# Altium PCB Solenoid-Board-v2.0.PcbDoc (part 1 of 3)
Units mil, origin at the board's own origin, x right, y up, seen from the top; angles counter-clockwise.
Board outline 3149.61 x 4330.71 mil, 2 copper layers (Top Layer, Bottom Layer), stack 61.811 mil thick; 169 components, 111 nets, 466 pads, 161 vias.
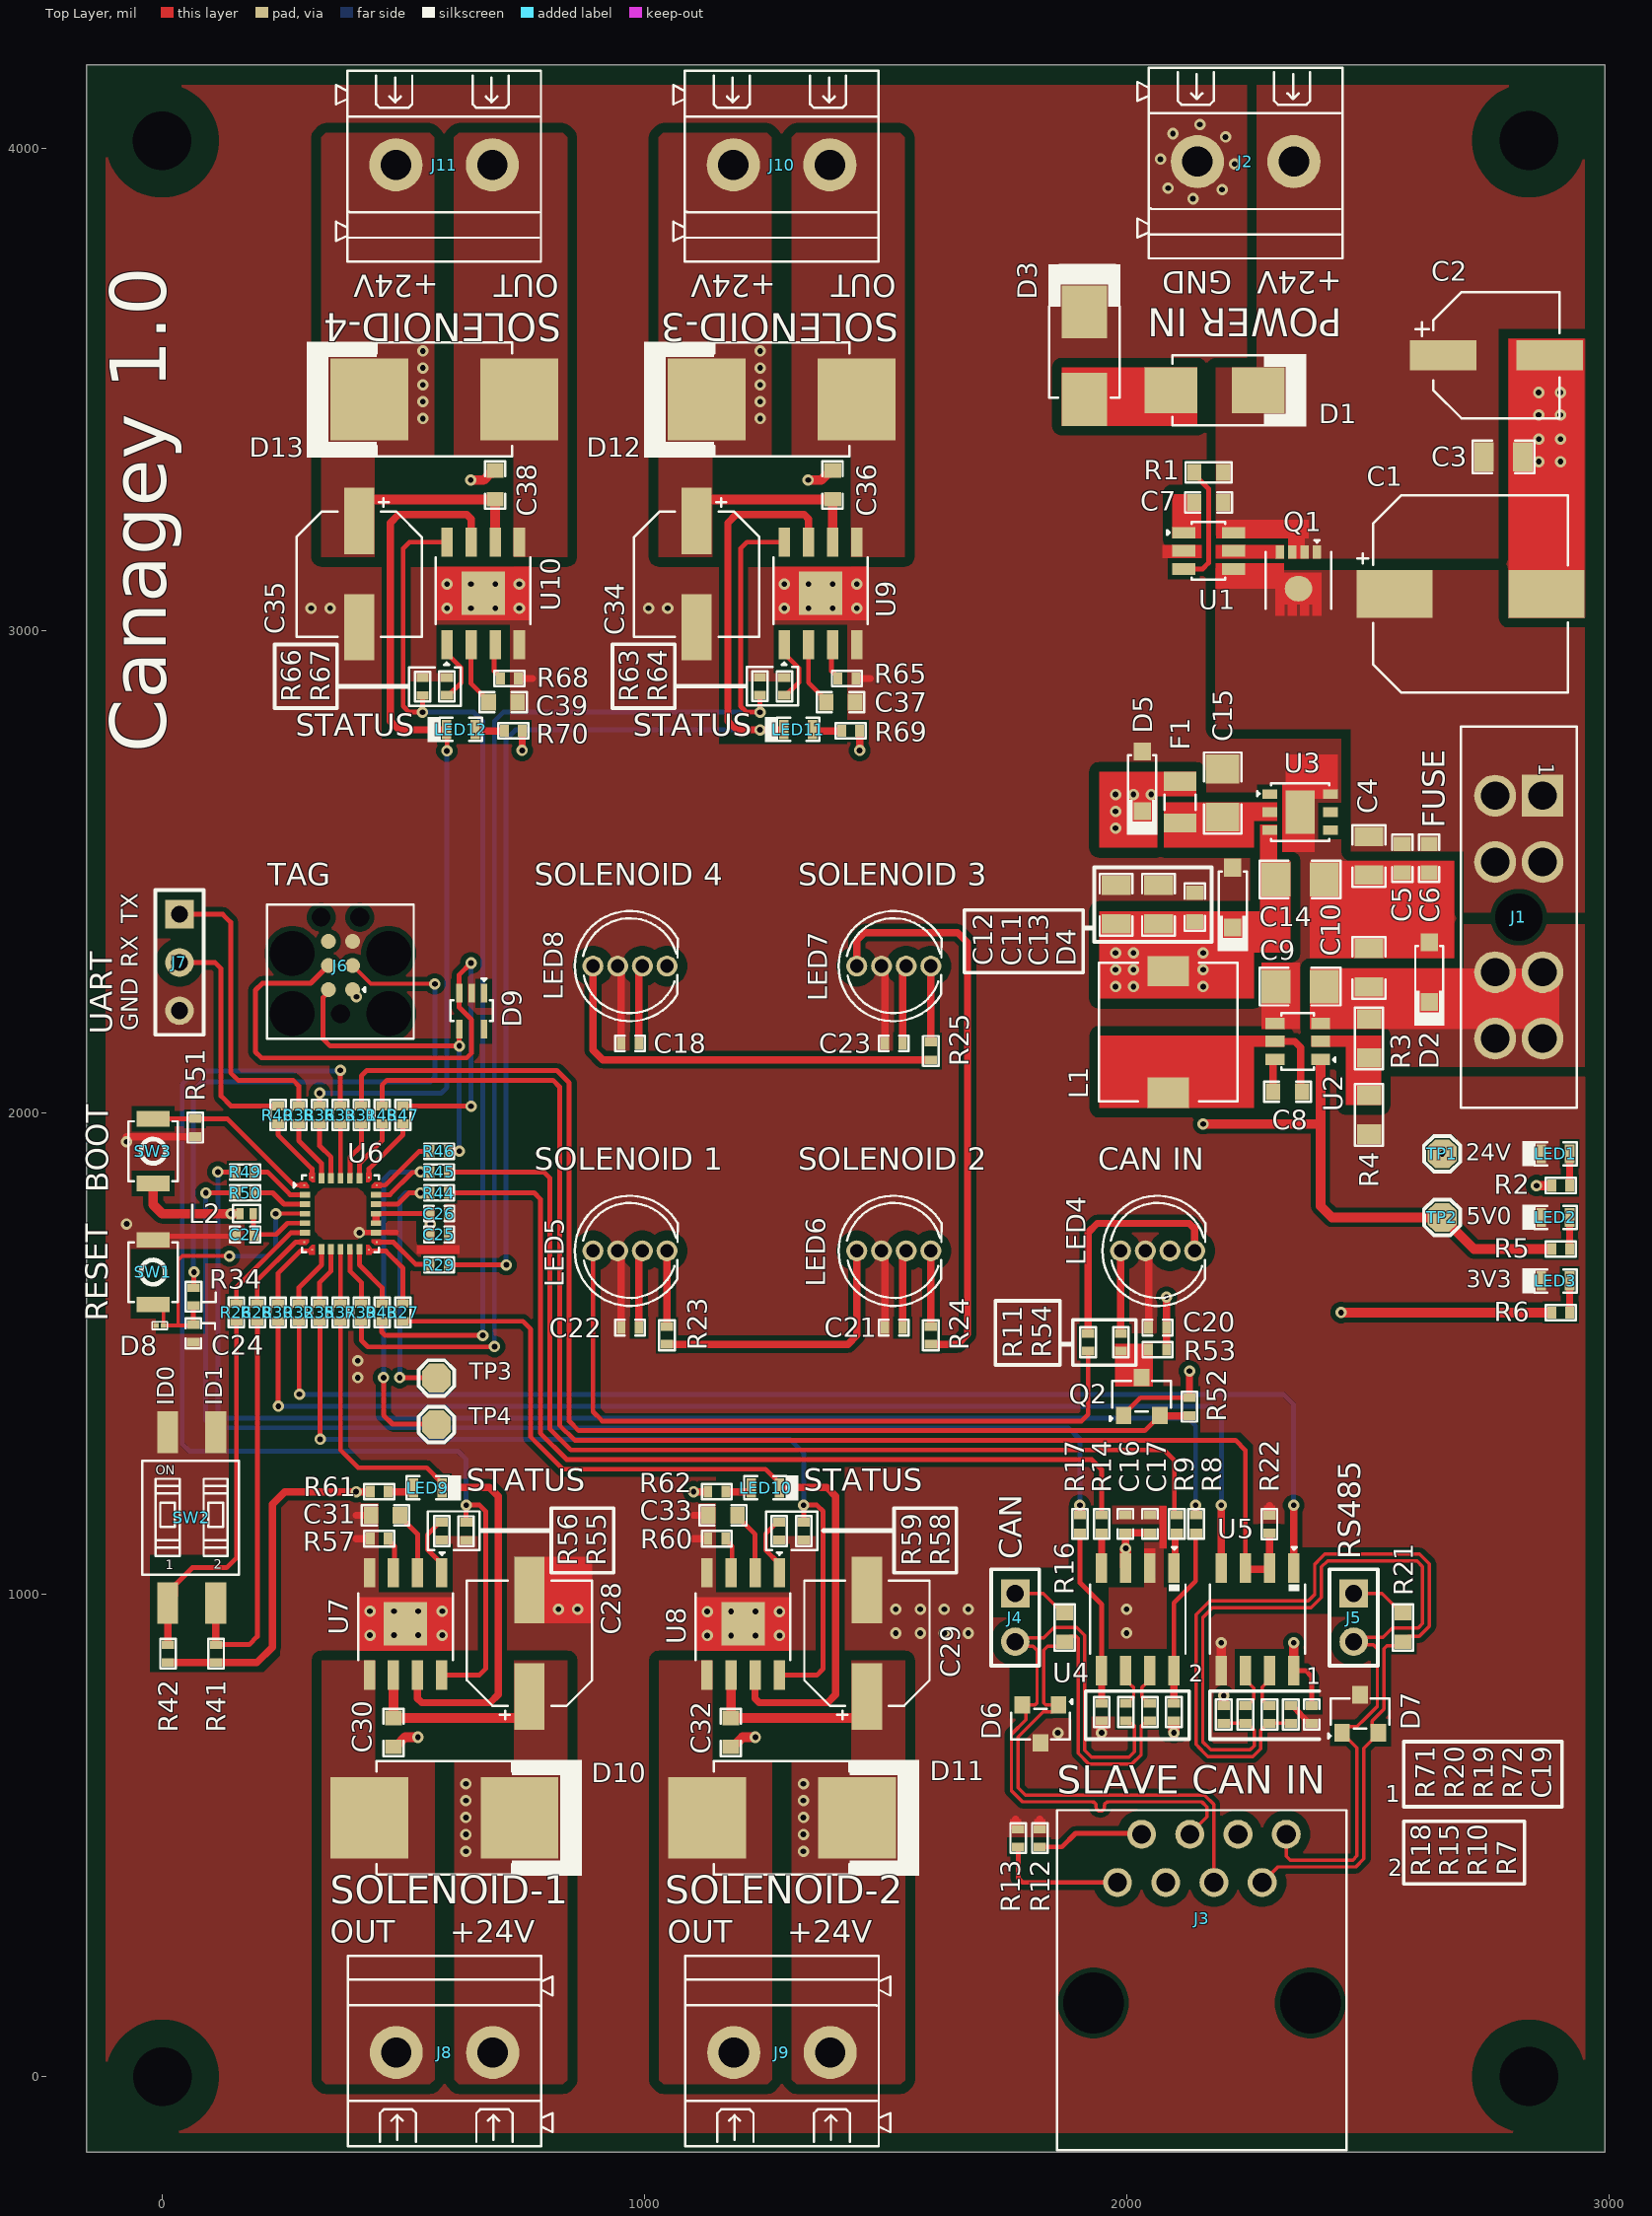
[diagram p0: Top Layer view]
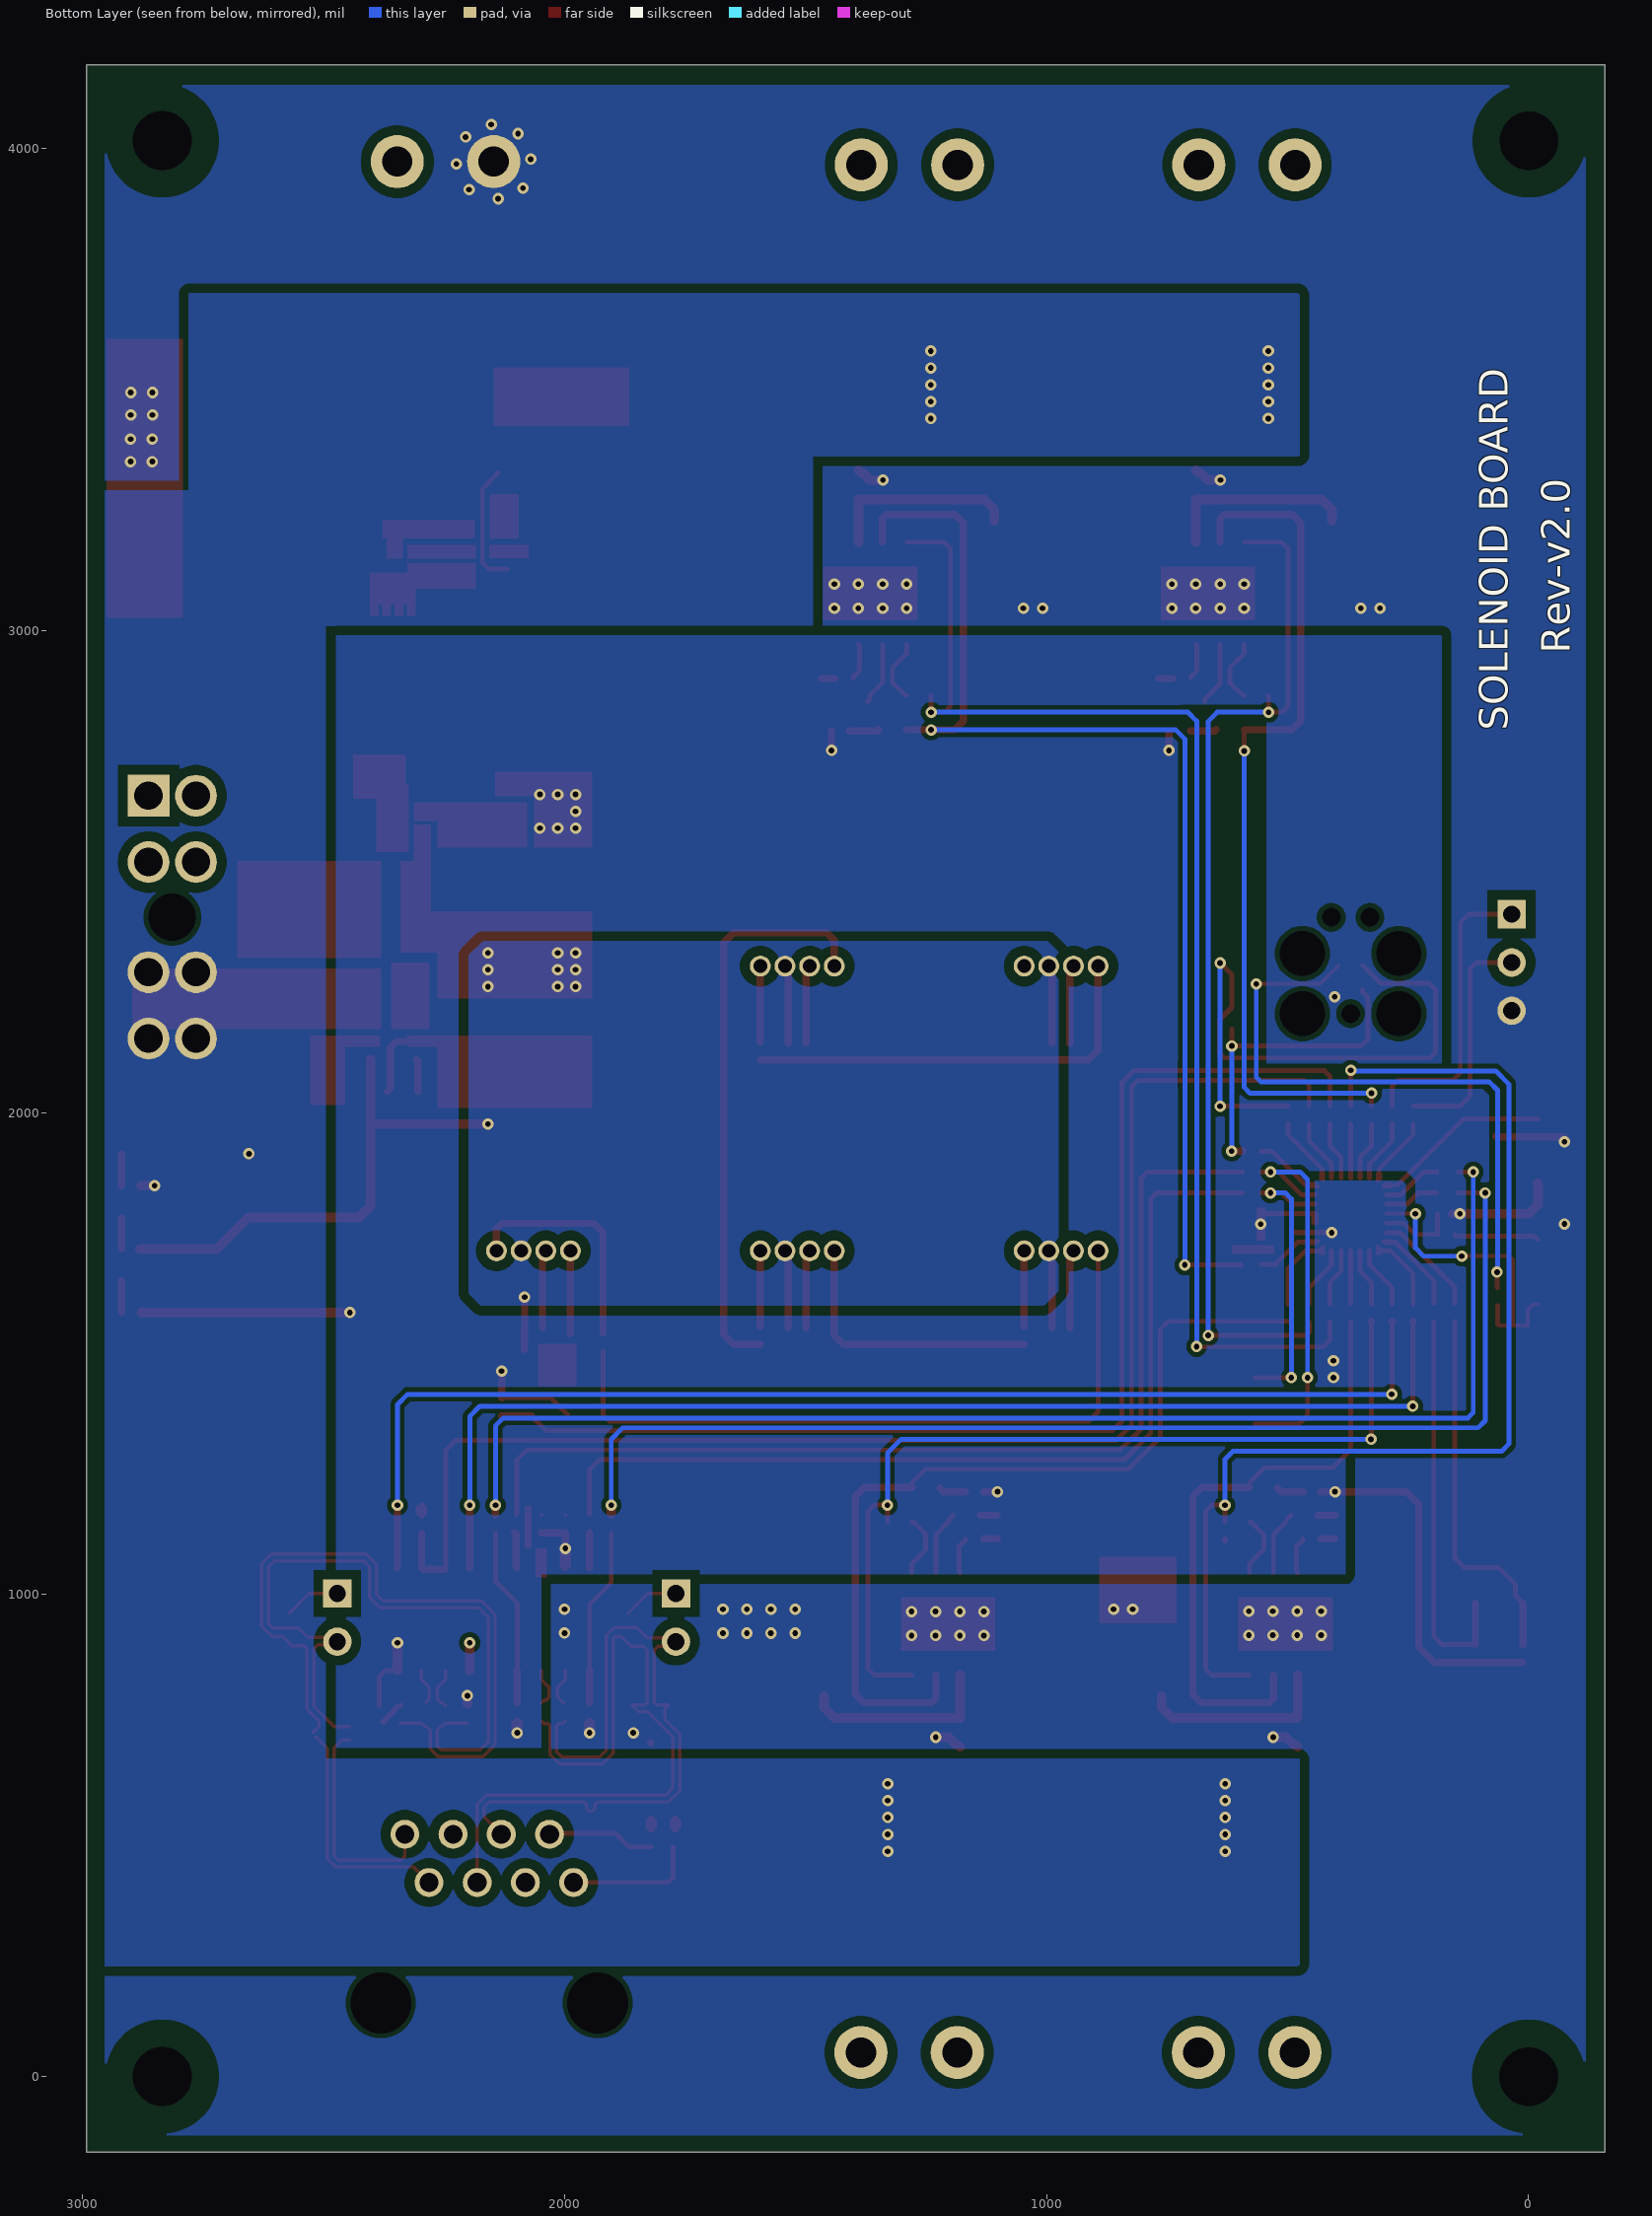
[diagram p1: Bottom Layer view, seen from below]
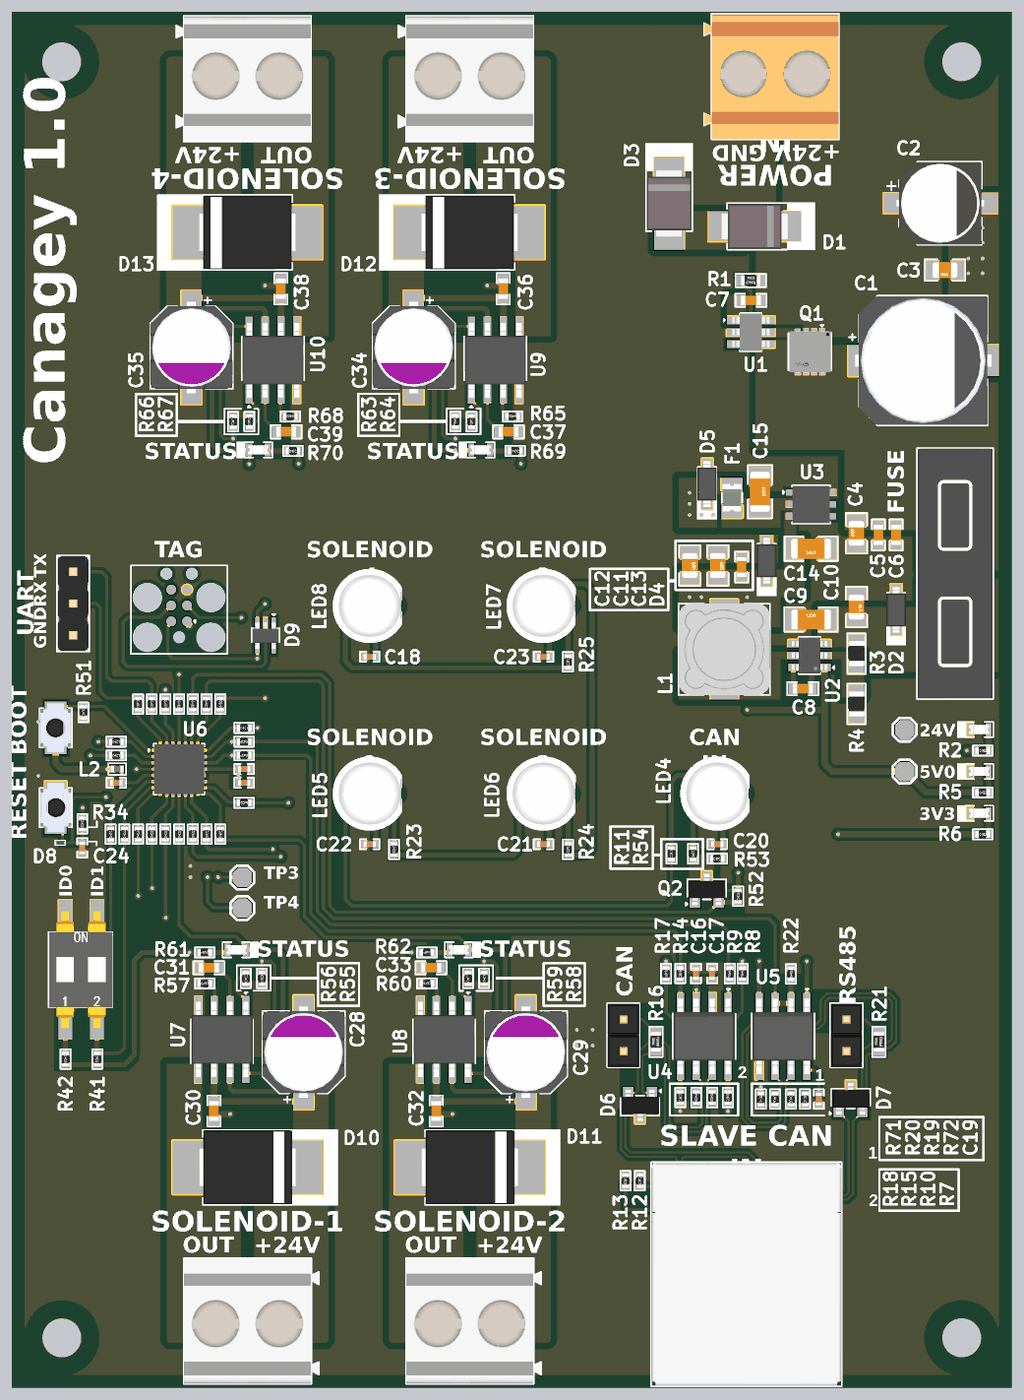
[diagram p3: 3D render of the assembled board from above, using the file's embedded part models]

## Layer stack, top to bottom
Top Solder: solder mask 0.394, Solder Resist, Dk 3.5
Top Layer: signal copper 1.378
Dielectric 1: dielectric 59.055, FR-4, Dk 4.6
Bottom Layer: signal copper 1.378
Bottom Solder: solder mask 0.394, Solder Resist, Dk 3.5

## Board outline
-157.85,-157.11 -157.85,4173.6 2991.76,4173.6 2991.76,-157.11

## Design rules (kind name [scope] priority, off if disabled: settings)
BoardOutlineClearance [All] p1: gap=0 ignorepadtopadclearanceinfootprint=FALSE except(10: Arc-OutlineEdge SMDPad-OutlineEdge THPad-OutlineEdge Via-OutlineEdge Fill-OutlineEdge Poly-OutlineEdge)
Clearance Clearance_DIFF [InAnyDifferentialPair] p1: gap=10 ignorepadtopadclearanceinfootprint=FALSE except(6: Arc-SMDPad Track-SMDPad SMDPad-SMDPad; 7: Arc-Track Arc-Fill Track-Track Track-Via Track-Fill Track-Region Track-Text SMDPad-Fill SMDPad-Region THPad-THPad Fill-Fill; 8: Region-Region; 20: THPad-Poly Fill-Poly Poly-Poly Poly-Region)
Clearance [All] p2: gap=10 ignorepadtopadclearanceinfootprint=FALSE except(4: SMDPad-SMDPad; 6: Arc-SMDPad Track-SMDPad; 7: Arc-Track Arc-Fill Track-Track Track-Via Track-Fill Track-Region Track-Text SMDPad-Fill SMDPad-Region THPad-THPad Fill-Fill; 8: Region-Region; 20: THPad-Poly Fill-Poly Poly-Poly Poly-Region)
DiffPairsRouting DIFF_CAN1 [InDifferentialPairClass('DIFF_CAN')] p1: maxlimit=7 minlimit=7 mostfreqgap=7 toplayer_minwidth=7 toplayer_maxwidth=7 toplayer_prefwidth=7 bottomlayer_minwidth=7 bottomlayer_maxwidth=7 bottomlayer_prefwidth=7 impedanceprofiledriven=TRUE impedanceprofileid={AF431588-A3C0-40A6-A26B-CB03469C8758} impedanceprofilevalue=120.000000 maxuncoupledlength=500
DiffPairsRouting DIFF_RS485 [InDifferentialPairClass('DIFF_RS485')] p2: maxlimit=7 minlimit=7 mostfreqgap=7 toplayer_minwidth=7 toplayer_maxwidth=7 toplayer_prefwidth=7 bottomlayer_minwidth=7 bottomlayer_maxwidth=7 bottomlayer_prefwidth=7 impedanceprofiledriven=TRUE impedanceprofileid={AF431588-A3C0-40A6-A26B-CB03469C8758} impedanceprofilevalue=120.000000 maxuncoupledlength=500
HoleSize [All] p1: absolutevalues=TRUE maxlimit=137.8 minlimit=1 maxpercent=80.000 minpercent=20.000
MinimumSolderMaskSliver [All] p1: minsoldermaskwidth=0
PolygonConnect [All] p1: connectstyle=Direct reliefconductorwidth=10 reliefentries=4 polygonreliefangle="90 Angle" airgapwidth=10
RoutingVias [All] p1: holewidth=11.81 width=23.62 viastyle="Through Hole" minholewidth=7.87 minwidth=15.75 maxholewidth=11.81 maxwidth=23.62
SilkToSilkClearance [All] p1: silktosilkclearance=0
SilkToSolderMaskClearance [IsPad] p1: minsilkscreentomaskgap=0 clearancetoexposedcopper=TRUE
SolderMaskExpansion [All] p1: expansion=4 istentingtop=FALSE
SupplyNets "Schematic Supply Nets_9" [InNet('3V3')] p1: voltage=0.000
SupplyNets "Schematic Supply Nets_8" [InNet('VIN')] p2: voltage=0.000
SupplyNets "Schematic Supply Nets_7" [InNet('GND')] p3: voltage=0.000
SupplyNets "Schematic Supply Nets_6" [InNet('24V')] p4: voltage=0.000
SupplyNets "Schematic Supply Nets_4" [InNet('5V')] p5: voltage=0.000
SupplyNets "Schematic Supply Nets_3" [InNet('AVDD')] p6: voltage=0.000
Width [All] p1: maxlimit=50 minlimit=4 preferedwidth=6 minimp=50.000000 maximp=50.000000 favimp=50.000000
25 further rules are at their usual default settings.

## Classes and differential pairs
component class U_Solenoid-Sheet: C28 C29 C30 C31 C32 C33 C34 C35 C36 C37 C38 C39 D10 D11 D12 D13 J8 J9 J10 J11 LED9 LED10 LED11 LED12 R55 R56 R57 R58 R59 R60 R61 R62 R63 R64 R65 R66 R67 R68 R69 R70 U7 U8 U9 U10
component class U_Controller-Sheet: C24 C25 C26 C27 D8 D9 J6 J7 L2 Q2 R26 R27 R28 R29 R30 R31 R32 R33 R34 R35 R36 R37 R38 R39 R40 R41 R42 R43 R44 R45 R46 R47 R48 R49 R50 R51 R52 R53 R54 SW1 SW2 SW3 TP3 TP4 U6
differential pair class DIFF_RS485: RS485
differential pair class DIFF_CAN: CAN1
component class U_Power-Sheet: C1 C2 C3 C4 C5 C6 C7 C8 C9 C10 C11 C12 C13 C14 C15 D1 D2 D3 D4 D5 F1 J1 J2 L1 LED1 LED2 LED3 Q1 R1 R2 R3 R4 R5 R6 TP1 TP2 U1 U2 U3
component class U_Comms-Sheet: C16 C17 C18 C19 C20 C21 C22 C23 D6 D7 J3 J4 J5 LED4 LED5 LED6 LED7 LED8 R7 R8 R9 R10 R11 R12 R13 R14 R15 R16 R17 R18 R19 R20 R21 R22 R23 R24 R25 R71 R72 U4 U5
differential pair RS485: +RS485_P -RS485_N
differential pair CAN1: +CAN1_P -CAN1_N

## Components (designator, comment, footprint, x,y, rotation, side; value= is the part's Value field where it differs from the comment)
C1 "220uF" UCD-220uF-10mmDia 2712.91,3075.63 r0 top
C2 "47uF" RVT1H470M0607 2766.95,3570.84 r0 top
C3 "22nF" Cap-0805 2781.68,3360.14 r180 top
C4 "10uF" Cap-0805 2502.68,2532.15 r90 top
C5 "1uF" Cap-0603 2571.69,2527.14 r90 top
C6 "0.1uF" Cap-0603 2627.69,2527.14 r90 top value=100nF
C7 "1uF" Cap-0603 2170.06,3265.03 r0 top
C8 "0.1uF" Cap-0603 2333.76,2043.06 r180 top value=100nF
C9 "4.7uF" Cap-1206 2359.84,2260.99 r0 top
C10 "10uF" Cap-0805 2502.67,2299.99 r270 top
C11 "22uF" Cap-0805 2066.06,2430.92 r270 top
C12 "22uF" Cap-0805 1978.06,2430.92 r270 top
C13 "0.1uF" Cap-0603 2141.06,2425.92 r270 top value=100nF
C14 "4.7uF" Cap-1206 2359.87,2483.46 r180 top
C15 "4.7uF" Cap-1206 2199.06,2662.8 r270 top
C16 "0.1uF" Cap-0402 1997.59,1146.34 r270 top value=100nF
C17 "4.7uF" Cap-0402 2048.09,1146.34 r270 top
C18 "0.1uF" Cap-0402 969.83,2143.57 r0 top value=100nF
C19 "0.1uF" Cap-0402 2384,751.34 r90 top value=100nF
C20 "0.1uF" Cap-0402 2064.07,1553.57 r0 top value=100nF
C21 "0.1uF" Cap-0402 1516.96,1553.57 r0 top value=100nF
C22 "0.1uF" Cap-0402 969.84,1553.57 r0 top value=100nF
C23 "0.1uF" Cap-0402 1516.96,2143.57 r0 top value=100nF
C24 "0.1uF" Cap-0402 64.3,1541.64 r90 top value=100nF
C25 "0.1uF" Cap-0402 574.07,1746.88 r0 top value=100nF
C26 "0.1uF" Cap-0402 574.08,1790.06 r0 top value=100nF
C27 "0.1uF" Cap-0402 171.58,1746.89 r180 top value=100nF
C28 "10uF" 50SVPF10M 761.33,899.07 r90 top
C29 "10uF" 50SVPF10M 1461.33,899.07 r90 top
C30 "0.1uF" Cap-0603 479.27,714.05 r90 top value=100nF
C31 "0.1uF" Cap-0603 462.77,1164.52 r0 top value=100nF
C32 "0.1uF" Cap-0603 1179.28,714.04 r90 top value=100nF
C33 "0.1uF" Cap-0603 1162.76,1164.51 r0 top value=100nF
C34 "10uF" 50SVPF10M 1108.09,3116.68 r270 top
C35 "10uF" 50SVPF10M 408.09,3116.68 r270 top
C36 "0.1uF" Cap-0603 1390.14,3301.7 r270 top value=100nF
C37 "0.1uF" Cap-0603 1406.66,2851.24 r180 top value=100nF
C38 "0.1uF" Cap-0603 690.14,3301.71 r270 top value=100nF
C39 "0.1uF" Cap-0603 706.66,2851.24 r180 top value=100nF
D1 "SMBJ58A-13-F" SMB_ 2182.33,3498.07 r0 top
D2 "AZ4024-01G" SOD-123 2627.69,2291 r270 top
D3 "SMBJ26A-13-F" SMB_ 1912.42,3570.07 r90 top
D4 "AZ3005-01G" SOD-123 2220.06,2445.83 r270 top
D5 "AZ3003-01G" SOD-123 2032.33,2686.96 r270 top
D6 "CDSOT23-T24CAN-Q" SOT-23 1821.16,731.72 r180 top
D7 "SM712" SOT-23 2484.38,752.72 r0 top
D8 "ESDM2033MX4T5G" DFN-2(0.3x0.6) -5.45,1558.14 r0 top
D9 "ESDALC6V1W5" SOT-323-5 641.33,2210.07 r270 top
D10 "MURS360T3G" SMC 585.08,536.83 r180 top
D11 "MURS360T3G" SMC 1285.08,536.83 r180 top
D12 "MURS360T3G" SMC 1284.34,3478.92 r0 top
D13 "MURS360T3G" SMC 584.33,3478.91 r0 top
F1 "0805L110SLYR" Fuse-0805 2110.83,2643.66 r90 top
J1 "178.6165.0002" 178.6165.0002 2813.47,2405.17 r270 top
J2 "DB128L-5.08-2P-OG-S" DB128L-5.08-2P-OG-S 2246.82,3972.46 r0 top
J3 "HC-RJ45-5622-1-6-Y" HC-RJ45-5622-1-6-Y 2156.04,327.73 r0 top
J4 "X6511WV-02H-C60D30" HDR1X2_ 1768.83,1002.24 r270 top
J5 "X6511WV-02H-C60D30" HDR1X2_ 2471.04,1002.24 r270 top
J6 "TC2030-IDC" TC2030-IDC_ 369.33,2304.85 r90 top
J7 "X6511WV-03H-C60D30" HDR1X3_ 35.34,2411.13 r270 top
J8 "DB128L-5.08-2P-GY-S" DB128L-5.08-2P-GY-S 585.08,50.07 r180 top
J9 "DB128L-5.08-2P-GY-S" DB128L-5.08-2P-GY-S 1285.08,50.07 r180 top
J10 "DB128L-5.08-2P-GY-S" DB128L-5.08-2P-GY-S 1284.34,3965.68 r0 top
J11 "DB128L-5.08-2P-GY-S" DB128L-5.08-2P-GY-S 584.34,3965.68 r0 top
L1 "4.7uH" YPRH0703-4R7M 2086.33,2167.07 r90 top
L2 "BLM15AG601SN1D" IND-0402 174.58,1790.08 r180 top
LED1 "RED" LED-0603 2889.48,1914.3 r180 top
LED2 "RED" LED-0603 2889.48,1782.31 r180 top
LED3 "RED" LED-0603 2889.48,1650.58 r180 top
LED4 "WS2812D-F5" WS2812D-F5 2064.31,1713.02 r0 top
LED5 "WS2812D-F5" WS2812D-F5 969.83,1713.02 r0 top
LED6 "WS2812D-F5" WS2812D-F5 1517.07,1713.02 r0 top
LED7 "WS2812D-F5" WS2812D-F5 1517.07,2303.57 r0 top
LED8 "WS2812D-F5" WS2812D-F5 969.83,2303.57 r0 top
LED9 "RED" LED-0603 550.58,1221.24 r0 top
LED10 "RED" LED-0603 1250.58,1221.24 r0 top
LED11 "RED" LED-0603 1318.84,2794.51 r180 top
LED12 "RED" LED-0603 618.84,2794.51 r180 top
Q1 "DMT6007LFG-7" PowerDI-3333-8 2356.33,3124.84 r270 top
Q2 "Si2302CDS" Sot-23 2031.21,1411 r0 top
R1 "100K" Res-0603 2170.06,3327.43 r180 top
R2 "3.9K" Res-0402 2900.42,1848.3 r0 top value=3.9kR
R3 "698K" RES-0805 2502.68,2153.47 r90 top value=698kR
R4 "51.1K" RES-0805 2502.68,1995.07 r90 top value=51.1kR
R5 "499R" Res-0402 2900.42,1716.58 r0 top
R6 "240R" Res-0402 2900.42,1584.86 r0 top
R7 "10K" Res-0402 2098.09,756.35 r270 top
R8 "0R" Res-0402 2144.08,1146.35 r270 top
R9 "0R" Res-0402 2104.09,1146.35 r270 top
R10 "0R" Res-0402 2048.09,756.34 r270 top
R11 "75R" Res-0402 1920,1523.27 r270 top
R12 "0R" Res-0402 1820,495 r270 top
R13 "0R" Res-0402 1775,495 r270 top
R14 "0R" Res-0402 1948.09,1146.34 r270 top
R15 "0R" Res-0402 1998.09,756.34 r270 top
R16 "120R" Res-0603 1871.21,931.77 r270 top
R17 "0R" Res-0402 1903.09,1146.34 r270 top
R18 "10K" Res-0402 1948.09,756.35 r90 top
R19 "0R" Res-0402 2296.39,751.34 r270 top
R20 "0R" Res-0402 2246.39,751.34 r270 top
R21 "120R" Res-0603 2573.42,931.77 r270 top
R22 "10K" Res-0402 2296.36,1145.85 r90 top
R23 "75R" Res-0402 1046.61,1537.56 r270 top
R24 "75R" Res-0402 1593.85,1537.56 r270 top
R25 "75R" Res-0402 1593.84,2127.57 r270 top
R26 "0R" Res-0402 153.44,1585.31 r90 top
R27 "0R" Res-0402 498.86,1585.31 r90 top
R28 "0R" Res-0402 196.62,1585.31 r90 top
R29 "0R" Res-0402 574.08,1683.71 r180 top
R30 "0R" Res-0402 239.8,1585.31 r90 top
R31 "0R" Res-0402 412.51,1994.82 r270 top
R32 "0R" Res-0402 282.97,1585.31 r90 top
R33 "0R" Res-0402 369.33,1994.82 r270 top
R34 "0R" Res-0402 64.63,1617.92 r270 top
R35 "0R" Res-0402 326.15,1585.31 r90 top
R36 "0R" Res-0402 326.15,1994.82 r270 top
R37 "0R" Res-0402 369.33,1585.31 r90 top
R38 "0R" Res-0402 282.97,1994.82 r270 top
R39 "0R" Res-0402 412.51,1585.31 r90 top
R40 "0R" Res-0402 239.8,1994.82 r270 top
R41 "10K" Res-0402 111.52,877.56 r270 top
R42 "10K" Res-0402 11.52,877.56 r270 top
R43 "0R" Res-0402 455.68,1585.31 r90 top
R44 "0R" Res-0402 574.07,1833.24 r180 top
R45 "0R" Res-0402 574.08,1876.42 r180 top
R46 "0R" Res-0402 574.08,1919.59 r0 top
R47 "0R" Res-0402 498.86,1994.82 r90 top
R48 "0R" Res-0402 455.68,1994.82 r270 top
R49 "0R" Res-0402 171.58,1876.42 r0 top
R50 "0R" Res-0402 171.58,1833.24 r0 top
R51 "10K" Res-0402 67.93,1968.66 r90 top
R52 "10K" Res-0402 2130.08,1389.74 r90 top
R53 "10K" Res-0402 2064.07,1508.28 r0 top
R54 "75R" Res-0402 1987.8,1523.27 r90 top
R55 "10K" Res-0402 630,1131.31 r90 top
R56 "1M" Res-0402 579.27,1131.72 r90 top value=1MR
R57 "1M" Res-0402 449.77,1115.72 r0 top value=1MR
R58 "10K" Res-0402 1330.07,1131.72 r90 top
R59 "1M" Res-0402 1279.28,1131.72 r90 top value=1MR
R60 "1M" Res-0402 1149.77,1115.72 r0 top value=1MR
R61 "240R" Res-0402 449.72,1213.24 r180 top
R62 "240R" Res-0402 1149.71,1213.23 r180 top
R63 "10K" Res-0402 1239.42,2884.44 r270 top
R64 "1M" Res-0402 1290.14,2884.03 r270 top value=1MR
R65 "1M" Res-0402 1419.65,2900.03 r180 top value=1MR
R66 "10K" Res-0402 539.42,2883.44 r270 top
R67 "1M" Res-0402 590.14,2884.03 r270 top value=1MR
R68 "1M" Res-0402 719.65,2900.02 r180 top value=1MR
R69 "240R" Res-0402 1427.68,2791.49 r0 top
R70 "240R" Res-0402 727.7,2791.51 r0 top
R71 "560R" Res-0402 2201.38,751.34 r90 top
R72 "560R" Res-0402 2340.38,751.34 r90 top
SW1 "B3U-1000P" B3U-1000P -19.36,1668.71 r90 top
SW2 "DSIC02LSGET" DSIC02LSGET 60.55,1159.36 r90 top
SW3 "B3U-1000P" B3U-1000P -19.36,1919.66 r270 top
TP1 "TEST POINT" Test-point 2654.48,1914.3 r0 top
TP2 "TEST POINT" Test-point 2654.48,1782.31 r0 top
TP3 "TEST POINT" Test-point 568.23,1449.03 r0 top
TP4 "TEST POINT" Test-point 568.23,1352.57 r0 top
U1 "LM74700QDBVRQ1" SOT-23-6 2170.07,3165.04 r0 top
U2 "AP63205WU-7" TSOT-23-6 2354.87,2147.47 r180 top
U3 "ST1L05APU33R" DFN-6(3x3) 2359.87,2622.99 r0 top
U4 "TCAN3414DR" "SOIC-8(0.154\", 3.90mm Width)" 2023.09,948.75 r270 top
U5 "THVD1449DR" "SOIC-8(0.154\", 3.90mm Width)" 2271.38,948.75 r270 top
U6 "STM32F042G6U6" "28-UFQFPN (4x4)" 369.33,1790.07 r0 top
U7 "DRV103H/2K5" "8-SO PowerPad" 504.27,939.07 r270 top
U8 "DRV103H/2K5" "8-SO PowerPad" 1204.27,939.07 r270 top
U9 "DRV103H/2K5" "8-SO PowerPad" 1365.15,3076.68 r90 top
U10 "DRV103H/2K5" "8-SO PowerPad" 665.15,3076.68 r90 top

## Footprints (in the part's own frame and the unit in brackets; to place one, negate y for a bottom-side part, rotate by r counter-clockwise, add the part's x,y. Pads: shape width x height; smd on the part's side, far side on the other; paste and mask are expansions set on the pad)
"8-SO PowerPad" [mm]
  rect 1.55x0.6 smd mask+0.07: 1(-2.7,1.905) 2(-2.7,0.635) 3(-2.7,-0.635) 4(-2.7,-1.905) 5(2.7,-1.905) 6(2.7,-0.635) 7(2.7,0.635) 8(2.7,1.905)
  rect 2.287x2.287 smd mask+0.07: 9(0,0)
  silkscreen extent -3.76,-2.49 1.9,2.49, body extent -3,-2.45 3,2.45, height 1.7
"28-UFQFPN (4x4)" [mm]
  rect 0.1x0.1 smd paste-1 mask+0: 1(-1.9,1.5) 7(-1.9,-1.5) 8(-1.5,-1.9) 14(1.5,-1.9) 15(1.9,-1.5) 21(1.9,1.5) 22(1.5,1.9) 28(-1.5,1.9)
  rect 0.55x0.3 smd mask+0.08: 2(-1.875,1) 3(-1.875,0.5) 4(-1.875,0) 5(-1.875,-0.5) 6(-1.875,-1) 16(1.875,-1) 17(1.875,-0.5) 18(1.875,0) 19(1.875,0.5) 20(1.875,1)
  rect 0.3x0.55 smd mask+0.08: 9(-1,-1.875) 10(-0.5,-1.875) 11(0,-1.875) 12(0.5,-1.875) 13(1,-1.875) 23(1,1.875) 24(0.5,1.875) 25(0,1.875) 26(-0.5,1.875) 27(-1,1.875)
  Top Layer region: -1.35,1.65 -1.5,1.65 -1.65,1.8 -1.65,2.15 -1.35,2.15
  Top Layer region: 1.65,1.8 1.5,1.65 1.35,1.65 1.35,2.15 1.65,2.15
  Top Layer region: 2.15,1.35 1.65,1.35 1.65,1.5 1.8,1.65 2.15,1.65
  Top Layer region: 2.15,-1.65 1.8,-1.65 1.65,-1.5 1.65,-1.35 2.15,-1.35
  Top Layer region: 1.65,-1.8 1.65,-2.15 1.35,-2.15 1.35,-1.65 1.5,-1.65
  Top Layer region: -1.35,-2.15 -1.65,-2.15 -1.65,-1.8 -1.5,-1.65 -1.35,-1.65
  Top Layer region: -1.65,-1.5 -1.8,-1.65 -2.15,-1.65 -2.15,-1.35 -1.65,-1.35
  Top Layer region: -1.65,1.5 -1.65,1.35 -2.15,1.35 -2.15,1.65 -1.8,1.65
  silkscreen extent -2.46,-2.03 2.03,2.03, body extent -2,-2 2,2, height 0.6
50SVPF10M [mm]
  rect 3.5x1.6 smd: 1(-2.8,0) 2(2.8,0)
  silkscreen extent -4.01,-3.3 3.3,3.3, body extent -3.65,-3.3 3.65,3.3, height 5.9
178.6165.0002 [mm]
  rect 2.2x2.2 hole 1.5 paste-2539.97 mask+0.051: 1(-6.4,1.25)
  round 2.2 hole 1.5 paste-2539.97 mask+0.051: 2(-2.9,1.25) 3(2.9,1.25) 4(6.4,1.25) 5(6.4,-1.25) 6(2.9,-1.25) 7(-2.9,-1.25) 8(-6.4,-1.25)
  round 0 hole 2.5 unplated paste-2539.97: ""(0,0)
  silkscreen extent -10.03,-3.05 10.03,3.05, body extent -10,-3 10,3, height 17.5
B3U-1000P [mm] "SWITCH TACTILE SPST-NO 0.05A 12V"
  rect 0.82x1.72 smd: 1(-1.7,0) 2(1.7,0)
  silkscreen extent -1.57,-1.3 1.57,1.3, body extent -2,-1.26 2,1.24, height 1.6
Cap-0402 [mil]
  rect 18x25 smd mask+2.36: 1(-18.5,0) 2(18.5,0)
  silkscreen extent -31,-16 31,16, body extent -20,-10 20,10, height 19
Cap-0603 [mil]
  rect 30x35 smd mask+2.36: 1(-30,0) 2(30,0)
  silkscreen extent -49,-21 49,21, body extent -32,-16 31,16, height 34
Cap-0805 [mil] "SMD 0805"
  rect 40x60 smd mask+2.76: 1(-40,0) 2(40,0)
  silkscreen extent -64,-34 64,34, body extent -39,-25 39,25, height 30
Cap-1206 [mil] "SMD 1206"
  rect 60x70 smd: 1(-50,0) 2(50,0)
  silkscreen extent -84,-39 84,39, body extent -63,-31 63,32, height 39
DB128L-5.08-2P-GY-S [mm]
  round 2.8 hole 1.6: 1(-2.54,0) 2(2.54,0)
  silkscreen extent -5.7,-5.1 5.1,4.95, body extent -5.67,-5.08 5.09,4.92, height 14.1
DB128L-5.08-2P-OG-S [mm]
  round 2.8 hole 1.6: 1(-2.54,0) 2(2.54,0)
  silkscreen extent -5.7,-5.1 5.1,4.95, body extent -5.68,-5.09 5.08,4.91, height 14
DFN-2(0.3x0.6) [mm]
  rect 0.27x0.26 smd mask+0.05: 1(-0.195,0) 2(0.195,0)
  silkscreen extent -0.41,-0.2 0.41,0.2, body extent -0.3,-0.15 0.3,0.15, height 0.3
DFN-6(3x3) [mm]
  rect 0.8x0.5 smd paste+0 mask+0.051: 1(-1.6,0.95) 2(-1.6,0) 3(-1.6,-0.95) 4(1.6,-0.95) 5(1.6,0) 6(1.6,0.95)
  rect 1.55x2.3 smd paste+0 mask+0.051: 7(0,0)
  silkscreen extent -2.26,-1.52 1.52,1.52, body extent -1.5,-1.5 1.5,1.5, height 1.04
DSIC02LSGET [mm]
  rect 2.2x1.1 smd paste+0 mask+0.05: 1(-4.5,1.27) 2(-4.5,-1.27) 3(4.5,-1.27) 4(4.5,1.27)
  silkscreen extent -3,-2.5 3,2.6, body extent -4.65,-2.54 4.65,2.54, height 4.35
Fuse-0805 [mm]
  rect 1x1.7 smd: 1(-1.1,0) 2(1.1,0)
  silkscreen extent -0.41,-0.81 0.41,0.81, body extent -1.1,-0.75 1.1,0.75, height 1.24
HC-RJ45-5622-1-6-Y [mil]
  round 60 hole 39.37 paste-99999 mask+2: 1(175,175) 2(125,75) 3(74.99,175) 4(25,75) 5(-25,175) 6(-75,75) 7(-125.01,175) 8(-175,75)
  round 0 hole 125.98 unplated paste-99999: ""(-225,-175) ""(225,-175)
  silkscreen extent -300,-480 300,225, body extent -299,-478 299,223, height 465
HDR1X2_ [mm] "CONN HEADER VERT 2POS 2.54MM"
  rect 1.5x1.5 hole 0.9: 1(0,0)
  round 1.5 hole 0.9: 2(2.54,0)
  silkscreen extent -1.27,-1.27 3.81,1.27, body extent -1.27,-1.27 3.81,1.27, height 8.44
HDR1X3_ [mm] "Connector; Header; 3 Position"
  rect 1.5x1.5 hole 0.9: 1(0,0)
  round 1.5 hole 0.9: 2(2.54,0) 3(5.08,0)
  silkscreen extent -1.27,-1.27 6.35,1.27, body extent -1.27,-1.24 6.35,1.25, height 8.54
IND-0402 [mm]
  rect 0.4x0.6 smd: 1(-0.35,0) 2(0.35,0)
  silkscreen extent -0.71,-0.46 0.71,0.46, body extent -0.5,-0.25 0.5,0.25, height 0.25
LED-0603 [mm]
  rect 0.5x1 smd: 1(-0.75,0) 2(0.75,0)
  silkscreen extent -1.12,-0.66 1.75,0.66, body extent -0.82,-0.37 0.82,0.36, height 0.68
PowerDI-3333-8 [mm]
  rect 0.7x0.42 smd paste-100 mask+0.05: 1(-0.97,0.975) 2(-0.97,0.325) 3(-0.97,-0.325) 4(-0.97,-0.975)
  oval 1.35x1.44 smd: 5(0.97,0)
  Top Layer region: 0.14,1.2 2.39,1.2 2.39,0.75 1.8,0.75 1.8,0.55 2.39,0.55 2.39,0.1 1.8,0.1 1.8,-0.1 2.39,-0.1 2.39,-0.55 1.8,-0.55 1.8,-0.75 2.39,-0.75 2.39,-1.2 0.14,-1.2 0.14,1.2
  silkscreen extent -1.59,-1.73 2.03,1.73, body extent -1.12,-1.66 2.2,1.66, height 0.81
Res-0402 [mil]
  rect 18x25 smd mask+2.17: 1(-18.5,0) 2(18.5,0)
  silkscreen extent -32,-17 32,16, body extent -23,-11 23,11, height 16
Res-0603 [mil]
  rect 30x35 smd: 1(-30,0) 2(30,0)
  silkscreen extent -48,-21 48,21, body extent -31,-17 31,17, height 18
RES-0805 [mil] "SMD 0805"
  rect 40x50 smd: 1(-40,0) 2(40,0)
  silkscreen extent -64,-29 64,29, body extent -39,-25 39,24, height 24
RVT1H470M0607 [mm]
  rect 3.5x1.6 smd: 1(-2.8,0) 2(2.8,0)
  silkscreen extent -4.27,-3.33 3.32,3.33, body extent -3.5,-3.3 3.5,3.3, height 7.7
SMB_ [mm]
  rect 2.8x2.4 smd: 1(-2.3,0) 2(2.3,0)
  silkscreen extent -2.21,-1.91 4.83,1.9, body extent -2.7,-1.8 2.7,1.8, height 2.3
SMC [mm]
  rect 4.1x4.3 smd: 1(-3.95,0) 2(3.95,0)
  silkscreen extent -7.24,-3.05 3.58,3.05, body extent -3.9,-2.95 3.9,2.95, height 2.41
SOD-123 [mm]
  rect 0.95x0.9 smd: 1(-1.575,0) 2(1.575,0)
  silkscreen extent -1.37,-0.8 2.82,0.8, body extent -1.82,-0.78 1.83,0.78, height 1.5
"SOIC-8(0.154\", 3.90mm Width)" [mm]
  rect 1.55x0.6 smd: 1(-2.7,1.905) 2(-2.7,0.635) 3(-2.7,-0.635) 4(-2.7,-1.905) 5(2.7,-1.905) 6(2.7,-0.635) 7(2.7,0.635) 8(2.7,1.905)
  silkscreen extent -3.79,-2.51 1.8,2.51, body extent -3.01,-2.45 3.01,2.45, height 1.63
SOT-23 [mm] "TRANS NPN 40V 0.6A SOT23"
  rect 0.82x0.92 smd: 1(-0.95,-1) 2(0.95,-1) 3(0,1)
  silkscreen extent -1.68,-1.3 1.55,0.81, body extent -1.5,-1.25 1.5,1.25, height 1.05
Sot-23 [mm] "TRANS NPN 40V 0.6A SOT23"
  rect 0.82x0.92 smd: 1(-0.95,-1) 2(0.95,-1) 3(0,1)
  silkscreen extent -1.68,-1.3 1.55,0.81, body extent -1.5,-1.25 1.5,1.25, height 1.05
SOT-23-6 [mm]
  rect 1.22x0.62 smd: 1(-1.31,0.95) 2(-1.31,0) 3(-1.31,-0.95) 4(1.31,-0.95) 5(1.31,0) 6(1.31,0.95)
  silkscreen extent -2.18,-1.52 0.86,1.52, body extent -1.5,-1.5 1.5,1.5, height 1.47
SOT-323-5 [mm]
  rect 1x0.35 smd: 1(-0.95,0.65) 2(-0.95,0) 3(-0.95,-0.65) 4(0.95,-0.65) 5(0.95,0.65)
  silkscreen extent -1.73,-1.12 0.51,1.12, body extent -1.05,-1.05 1.05,1.05, height 1
TC2030-IDC_ [mm] "CABLE ADAPTER 6 POS"
  round 0.787 smd: 1(-1.27,-0.635) 1(-1.27,-0.635) 2(-1.27,0.635) 3(0,-0.635) 4(0,0.635) 5(1.27,-0.635) 6(1.27,0.635)
  round 0 hole 2.375 unplated: MP1(-2.54,-2.54) MP2(0.635,-2.54) MP3(0.635,2.54) MP4(-2.54,2.54)
  round 0 hole 0.991 unplated: MP5(-2.54,0) MP6(2.54,-1.016) MP7(2.54,1.016)
  silkscreen extent -3.86,-3.86 3.2,3.86
Test-point [mil]
  oct 60x60 smd: 1(0,0)
  silkscreen extent -37,-37 37,37
TSOT-23-6 [mm]
  rect 1x0.6 smd: 1(-1.2,0.95) 2(-1.2,0) 3(-1.2,-0.95) 4(1.2,-0.95) 5(1.2,0) 6(1.2,0.95)
  silkscreen extent -1.98,-1.5 0.86,1.5, body extent -1.41,-1.45 1.41,1.45, height 1
UCD-220uF-10mmDia [mm] "0.406\" L x 0.406\" W (10.30mm x 10.30mm)"
  rect 4x2.5 smd: 1(-4,0) 2(4,0)
  silkscreen extent -5.95,-5.21 5.13,5.21, body extent -5.45,-5.15 5.45,5.15, height 10.8
WS2812D-F5 [mm]
  round 1.1 hole 0.72 paste-2539.97 mask+0.051: 1(1.95,0) 2(0.65,0) 3(-0.65,0) 4(-1.95,0)
  silkscreen extent -2.91,-2.9 2.51,2.9, body extent -2.9,-2.9 2.51,2.9, height 8.7
YPRH0703-4R7M [mm]
  rect 1.6x2.2 smd: 1(-3.2,0) 2(3.2,0)
  silkscreen extent -3.65,-3.65 3.65,3.65, body extent -3.66,-3.66 3.66,3.66, height 4.2

## Part data
C1: library part UCD1H221MNL1GS, "CAP ALUM 220UF 20% 50V SMD", Case/Package=Radial, LCSC Part Number=C116211, Leakage Current=3uA, Manufacturer=Nichicon, Max Operating Temperature=105°C, Min Operating Temperature=-55°C, Package Quantity=1, Ripple Current=700mA, Supplier Part Number 1=493-6390-1-ND, Tolerance=20%, Voltage=50V, Capacitance=220uF, Category="Aluminum Electrolytic Capacitors", ComponentLink1Description=https://datasheet.ciiva.com/11776/0900766b80ebdadd-11776792.pdf?src-supplier=RSComponents, ComponentLink1URL=https://datasheet.ciiva.com/11776/0900766b80ebdadd-11776792.pdf?src-supplier=RSComponents, ComponentLink2Description=https://datasheet.ciiva.com/5362/e-cd-22158-5362489.pdf?src-supplier=Mouser, ComponentLink2URL=https://datasheet.ciiva.com/5362/e-cd-22158-5362489.pdf?src-supplier=Mouser, ComponentLink3Description=https://datasheet.ciiva.com/11684/e-cd-11684678.pdf?src-supplier=Avnet, ComponentLink3URL=https://datasheet.ciiva.com/11684/e-cd-11684678.pdf?src-supplier=Avnet, ComponentLink4Description=https://datasheet.ciiva.com/15037/e-cd-15037119.pdf?src-supplier=Digi-Key, ComponentLink4URL=https://datasheet.ciiva.com/15037/e-cd-15037119.pdf?src-supplier=Digi-Key, ComponentLink5Description=https://datasheet.ciiva.com/16393/e-cd-16393493.pdf?src-supplier=Future+Electronics, ComponentLink5URL=https://datasheet.ciiva.com/16393/e-cd-16393493.pdf?src-supplier=Future+Electronics, ComponentLink6Description=https://datasheet.ciiva.com/17354/e-cd-17354606.pdf?src-supplier=Avnet+Europe, ComponentLink6URL=https://datasheet.ciiva.com/17354/e-cd-17354606.pdf?src-supplier=Avnet+Europe, Construction=Cylindrical, Diameter=10mm, Dissipation Factor=0.1%, Features="General Purpose", Height=10mm, Height - Seated (Max)=0.394inch, Impedance=160mR, Item Type=Capacitor, Lead Free="Lead Free", Length=10mm, Life (Hours)=5000Hour, Manufacturer Part Number=UCD1H221MNL1GS, Mount="Surface Mount,PCB", Packaging="Tape and Reel", Pricing 1="1=0.85000, 10=0.60200, 50=0.45480, 100=0.39620 (USD)", Radiation Hardening=No, RoHS=Yes, RoHS Compliant=Yes, Series=CD, Supplier 1=Digi-Key, Termination=SMD/SMT, Voltage Rating=50V, Voltage Rating (DC)=50V
C2: library part RVT1H470M0607, "47uF 50V 66mA@120Hz ±20% SMD,D6.3xL7.7mm Aluminum Electrolytic Capacitors - SMD ROHS", LCSC Part Number=C72523, Manufacturer=ROQANG, Package=SMD,D6.3xL7.7mm, ComponentLink1Description=LCSC, ComponentLink1URL=https://www.lcsc.com/product-detail/Aluminum-Electrolytic-Capacitors-SMD_ROQANG-RVT1H470M0607_C72523.html, Item Type=Capacitor, Manufacturer Part Number=RVT1H470M0607
C3: library part CC0805JRX7R0BB223, "CAP CER 0.022UF 100V X7R 0805", Case/Package=0805, Dielectric=X7R, LCSC Part Number=C576993, Manufacturer=Yageo, Max Operating Temperature=125°C, Min Operating Temperature=-55°C, Tolerance=5%, ComponentLink1Description=https://datasheet.ciiva.com/11494/upy-np0x7r-mv-100-to-630v-9-11494760.pdf?src-supplier=Avnet, ComponentLink1URL=https://datasheet.ciiva.com/11494/upy-np0x7r-mv-100-to-630v-9-11494760.pdf?src-supplier=Avnet, Construction=Flat, Depth=1.25mm, Height=0.85mm, Item Type=Capacitors, Length=2mm, Manufacturer Part Number=CC0805JRX7R0BB223, Mounting Technology="Surface Mount", Pricing="1=0.13, 10=0.07, 50=0.0488, 100=0.0421, 500=0.03086, 1000=0.02736 (USD)", RoHS=Yes, RoHS Compliant=Yes, Stock=2257, Supplier=Digikey
C4 C10: library part GRM21BR61H106ME43L, "CAP CER 10UF 50V X5R 0805", LCSC Part Number=C2190942, Manufacturer=Murata, Supplier Part Number 1=490-18664-1-ND, Category="Ceramic Capacitors", Manufacturer Part Number=GRM21BR61H106ME43L, Pricing 1="1=0.44000, 10=0.30700, 50=0.21500, 100=0.18420, 500=0.13818, 1000=0.11668 (USD)", RoHS=Yes, Stock 1=26, Supplier 1=Digi-Key
C5 C7: library part CL10A105KB8NNNC, "CAP CER 1UF 50V X5R 0603", Case Code (Imperial)=0603, Case Code (Metric)=1608, Dielectric=X5R, LCSC Part Number=C15849, Manufacturer=Samsung, Max Operating Temperature=85°C, Min Operating Temperature=-55°C, Tolerance=10%, Voltage Rating=50V, Case/Package=0603, Category="Ceramic Capacitors", ComponentLink1Description=https://datasheet.ciiva.com/26877/getdatasheetpartid-753736-26877879.pdf?src-supplier=Verical, ComponentLink1URL=https://datasheet.ciiva.com/26877/getdatasheetpartid-753736-26877879.pdf?src-supplier=Verical, Depth=0.8mm, Item Type=Capacitor, Length=1.6mm, Manufacturer Part Number=CL10A105KB8NNNC, Material=4241ConductorMaterial, Mounting Technology="Surface Mount", Packaging="Tape and Reel", Pricing="4000=0.01632, 8000=0.01595, 16000=0.01557, 24000=0.0152, 32000=0.01482 (USD)", Radiation Hardening=No, RoHS=Yes, RoHS Compliant=Yes, Series=CL, Stock=780446, Supplier=Avnet, Supplier Part Number=CL10A105KB8NNNC, Voltage Rating (DC)=50V
C6 C8 C13 C30 C31 C32 C33 C36 C37 C38 C39: library part CL10B104KB8WPNC, "CAP CER 0.1UF 50V X7R 0603", Case Code (Imperial)=0603, Case Code (Metric)=1608, LCSC Part Number=C307348, Max Operating Temperature=125°C, Min Operating Temperature=-55°C, Ratings=AEC-Q200, Supplier Part Number=2575919, Tolerance=10%, Voltage Rating=50V, Case/Package=0603, Category="Ceramic Capacitors", ComponentLink1Description=LCSC, ComponentLink2Description=http://www.farnell.com/datasheets/2710560.pdf?src-supplier=Farnell, ComponentLink2URL=http://www.farnell.com/datasheets/2710560.pdf?src-supplier=Farnell, ComponentLink3Description=http://www.samsungsem.com/kr/support/product-search/mlcc/CL10B104KB8WPNC.jsp?src-supplier=Digi-Key, ComponentLink3URL=http://www.samsungsem.com/kr/support/product-search/mlcc/CL10B104KB8WPNC.jsp?src-supplier=Digi-Key, ComponentLink4Description=http://www.farnell.com/datasheets/2710560.pdf?src-supplier=Element14, ComponentLink4URL=http://www.farnell.com/datasheets/2710560.pdf?src-supplier=Element14, ComponentLink5Description=https://datasheet.octopart.com/CL10B104KB8WPNC-Samsung-Electro-Mechanics-datasheet-120093645.pdf?src-supplier=Future+Electronics, ComponentLink5URL=https://datasheet.octopart.com/CL10B104KB8WPNC-Samsung-Electro-Mechanics-datasheet-120093645.pdf?src-supplier=Future+Electronics, ComponentLink6Description=http://www.farnell.com/datasheets/2710560.pdf?src-supplier=Newark, ComponentLink6URL=http://www.farnell.com/datasheets/2710560.pdf?src-supplier=Newark, ComponentLink7Description=http://www.samsungsem.com/servlet/FileDownload?type=spec&file=CL10B104KB8WPNC.pdf&src-supplier=Avnet, ComponentLink7URL=http://www.samsungsem.com/servlet/FileDownload?type=spec&file=CL10B104KB8WPNC.pdf&src-supplier=Avnet, ComponentLink8Description=https://datasheet.octopart.com/CL10B104KB8WPNC-Samsung-datasheet-8326407.pdf?src-supplier=TME, ComponentLink8URL=https://datasheet.octopart.com/CL10B104KB8WPNC-Samsung-datasheet-8326407.pdf?src-supplier=TME, Height=900um, Item Type=Capacitor, Lead Free=5697LeadFree, Material=4241ConductorMaterial, Mounting Technology="Surface Mount", Packaging="Cut Tape", Pricing="100=0.021, 500=0.019, 1000=0.015, 2000=0.01 (GBP)", RoHS=Yes, RoHS Compliant=Yes, Series=CL, Stock=400, Supplier=Rs, Voltage Rating (DC)=50V
C9 C14 C15: library part UMK316AB7475KL-T, "CAP CER 4.7UF 50V X7R 1206", Case Code (Imperial)=1206, Case Code (Metric)=3216, Dielectric=X7R, LCSC Part Number=C92853, Manufacturer="Taiyo Yuden", Max Operating Temperature=125°C, Min Operating Temperature=-55°C, Package Quantity=2000, Tolerance=10%, Voltage Rating=50V, Case/Package=1206, ComponentLink1Description=https://datasheet.ciiva.com/170/umk316ab7475kl-t-ss-170928.pdf?src-supplier=Digikey, ComponentLink1URL=https://datasheet.ciiva.com/170/umk316ab7475kl-t-ss-170928.pdf?src-supplier=Digikey, ComponentLink2Description=https://datasheet.ciiva.com/2990/umk316ab7475kl-t-ss-2990070.pdf?src-supplier=Avnet, ComponentLink2URL=https://datasheet.ciiva.com/2990/umk316ab7475kl-t-ss-2990070.pdf?src-supplier=Avnet, ComponentLink3Description=https://datasheet.ciiva.com/15922/1010umk316ab7475kl-t-15922628.pdf?src-supplier=Onlinecomponents.com, ComponentLink3URL=https://datasheet.ciiva.com/15922/1010umk316ab7475kl-t-15922628.pdf?src-supplier=Onlinecomponents.com, ComponentLink4Description=https://datasheet.ciiva.com/7975/1481447-7975911.pdf?src-supplier=Element14, ComponentLink4URL=https://datasheet.ciiva.com/7975/1481447-7975911.pdf?src-supplier=Element14, ComponentLink5Description=https://datasheet.ciiva.com/5413/mlcc-all-e-541559-5413006.pdf?src-supplier=Mouser, ComponentLink5URL=https://datasheet.ciiva.com/5413/mlcc-all-e-541559-5413006.pdf?src-supplier=Mouser, Construction=Flat, Depth=1.6mm, Height=1.6mm, Item Type=Capacitor, Length=3.2mm, Manufacturer Part Number=UMK316AB7475KL-T, Mounting Technology="Surface Mount", Packaging="Tape and Reel", Pins=2, Pricing="1=0.3, 10=0.198, 50=0.146, 100=0.1189, 500=0.09386, 1000=0.07925 (USD)", Radiation Hardening=No, Reach SVHC Compliant=Unknown, RoHS=Yes, RoHS Compliant=Yes, Series=M, Stock=392550, Supplier=Digikey, Termination=SMD/SMT, Voltage Rating (DC)=50V, Width=1.6mm
C11 C12: library part GRM21BZ71A226ME15L, "CAP CER 22UF 10V X7R 0805", LCSC Part Number=C907991, Manufacturer=Murata, Max Operating Temperature=125°C, Min Operating Temperature=-55°C, Package=0805, Supplier Part Number=490-GRM21BZ71A226ME15LCT-ND, Tolerance=20%, Voltage Rating=10V, Category="Ceramic Capacitors", ComponentLink1Description=https://datasheet.octopart.com/GRM21BZ71A226ME15L-Murata-datasheet-165579666.pdf?src-supplier=TME, ComponentLink1URL=https://datasheet.octopart.com/GRM21BZ71A226ME15L-Murata-datasheet-165579666.pdf?src-supplier=TME, ComponentLink2Description=LCSC, ComponentLink2URL=https://www.lcsc.com/product-detail/Multilayer-Ceramic-Capacitors-MLCC-SMD-SMT_Murata-Electronics-GRM21BZ71A226ME15L_C907991.html, Height=1.45mm, Item Type=Capacitor, Length=2mm, Manufacturer Part Number=GRM21BZ71A226ME15L, Material=4241ConductorMaterial, Pricing="1=0.39, 10=0.259, 50=0.191, 100=0.1556, 500=0.12282, 1000=0.10372 (USD)", RoHS=Yes, Stock=49126, Supplier=Digi-Key, Thickness=1.25mm, Width=1.25mm
C16 C18 C19 C20 C21 C22 C23 C24 C25 C26 C27: library part CC0402JRX7R7BB104, "CAP CER 0.1UF 16V X7R 0402", Case Code (Imperial)=0402, Case Code (Metric)=1005, Dielectric=X7R, LCSC Part Number=C541464, Manufacturer=Yageo, Max Operating Temperature=125°C, Min Operating Temperature=-55°C, Package Quantity=10000, Supplier Part Number=311-1676-1-ND, Tolerance=5%, Voltage Rating=16V, Case/Package=0402, Category="Ceramic Capacitors", ComponentLink1Description=https://datasheet.ciiva.com/13210/upy-gphc-x7r-6-3v-to-50v-8-12304-13210152.pdf?src-supplier=Mouser, ComponentLink1URL=https://datasheet.ciiva.com/13210/upy-gphc-x7r-6-3v-to-50v-8-12304-13210152.pdf?src-supplier=Mouser, Construction=Flat, Halogen Free="Halogen Free", Height=0.5mm, Item Type=Capacitor, Lead Free="Lead Free", Length=0.039inch, Manufacturer Part Number=CC0402JRX7R7BB104, Material=4241ConductorMaterial, Mounting Technology="Surface Mount", Packaging="Tape and Reel", Pricing="1=0.1, 10=0.046, 50=0.0262, 100=0.0203, 500=0.01528, 1000=0.012, 2500=0.01091, 5000=0.01004 (USD)", RoHS=Yes, RoHS Compliant=Yes, Series=CC, Stock=1659111, Supplier=Digikey, Thickness=0.022inch, Voltage Rating (DC)=16V, Width=0.02inch
C17: library part CC0402KRX5R6BB475, "CAP CER 4.7UF 10V X5R 0402", Case Code (Imperial)=0402, Case Code (Metric)=1005, LCSC Part Number=C326586, Manufacturer=Yageo, Max Operating Temperature=85°C, Min Operating Temperature=-55°C, Supplier Part Number 1=3871698, Tolerance=10%, Voltage Rating=10V, Capacitance=4.7uF, Case/Package=0402, Category="Ceramic Capacitors", ComponentLink1Description=http://www.yageo.com/documents/recent/UPY-GPHC_X5R_4V-to-50V_25.pdf?src-supplier=Digi-Key, ComponentLink1URL=http://www.yageo.com/documents/recent/UPY-GPHC_X5R_4V-to-50V_25.pdf?src-supplier=Digi-Key, Manufacturer Part Number=CC0402KRX5R6BB475, Mount="Surface Mount", Packaging="Cut Tape", Pricing 1="10000=0.02310, 50000=0.02100 (GBP)", RoHS=Yes, RoHS Compliant=Yes, Stock 1=20000, Supplier 1=Farnell
C28 C29 C34 C35: library part 50SVPF10M, "CAP ALUM POLY 10UF 20% 50V SMD", LCSC Part Number=C2162323, Manufacturer=Panasonic, Supplier Part Number=667-50SVPF10M, Category="Polymer Capacitors", ComponentLink1Description=https://datasheet.ciiva.com/48542/svpf-eng-ds-48542427.pdf?src-supplier=Distrelec, ComponentLink1URL=https://datasheet.ciiva.com/48542/svpf-eng-ds-48542427.pdf?src-supplier=Distrelec, ComponentLink2Description=https://datasheet.ciiva.com/24216/svpf-os-262415-24216043.pdf?src-supplier=Mouser, ComponentLink2URL=https://datasheet.ciiva.com/24216/svpf-os-262415-24216043.pdf?src-supplier=Mouser, ComponentLink3Description=https://datasheet.ciiva.com/25761/1734360-25761263.pdf?src-supplier=Farnell, ComponentLink3URL=https://datasheet.ciiva.com/25761/1734360-25761263.pdf?src-supplier=Farnell, Item Type=Capacitor, Manufacturer Part Number=50SVPF10M, Material=4242ConductorMaterial, Pricing="1=1.12, 10=0.801, 50=0.801, 100=0.665, 1000=0.555, 10000=0.504 (USD)", RoHS=Yes, Stock=29802, Supplier=Mouser
D1: "TVS DIODE 58VWM 93.6VC SMB", LCSC Part Number=C135085, Manufacturer=Diodes, ComponentLink1Description=https://datasheet.ciiva.com/25624/0900766b8104bed2-25624843.pdf?src-supplier=Rs, ComponentLink1URL=https://datasheet.ciiva.com/25624/0900766b8104bed2-25624843.pdf?src-supplier=Rs, ComponentLink2Description=https://datasheet.ciiva.com/15143/getdatasheetpartid-39642-15143045.pdf?src-supplier=Verical, ComponentLink2URL=https://datasheet.ciiva.com/15143/getdatasheetpartid-39642-15143045.pdf?src-supplier=Verical, ComponentLink3Description=https://datasheet.ciiva.com/4520/ds19002-4520617.pdf?src-supplier=Mouser, ComponentLink3URL=https://datasheet.ciiva.com/4520/ds19002-4520617.pdf?src-supplier=Mouser, ComponentLink4Description=https://datasheet.ciiva.com/16393/ds19002-16393005.pdf?src-supplier=Future+Electronics, ComponentLink4URL=https://datasheet.ciiva.com/16393/ds19002-16393005.pdf?src-supplier=Future+Electronics, Item Type=Diode, Manufacturer Part Number=SMBJ58A-13-F, Pricing="3000=0.0711, 9000=0.0684, 15000=0.0671, 30000=0.0655, 60000=0.063 (USD)", RoHS=Yes, Stock=6000, Supplier="Future Electronics"
D2: "26.7V 24V SOD-123 ESD and Surge Protection (TVS/ESD) ROHS", LCSC Part Number=C5571859, Manufacturer=AMAZING, Package=SOD-123, ComponentLink1Description=LCSC, ComponentLink1URL=https://www.lcsc.com/product-detail/ESD-and-Surge-Protection-TVS-ESD_AMAZING-AZ4024-01G_C5571859.html, Item Type=(TVS/ESD), Manufacturer Part Number=AZ4024-01G
D3: "TVS DIODE 26VWM 42.1VC SMB", LCSC Part Number=C135062, Manufacturer=Diodes, Supplier Part Number=3363900, ComponentLink1Description=https://datasheet.ciiva.com/15143/getdatasheetpartid-118169-15143570.pdf?src-supplier=Verical, ComponentLink1URL=https://datasheet.ciiva.com/15143/getdatasheetpartid-118169-15143570.pdf?src-supplier=Verical, ComponentLink2Description=https://datasheet.ciiva.com/16211/ds19002-16211003.pdf?src-supplier=Future+Electronics, ComponentLink2URL=https://datasheet.ciiva.com/16211/ds19002-16211003.pdf?src-supplier=Future+Electronics, Item Type="TVS Diodes", Manufacturer Part Number=SMBJ26A-13-F, Pricing="3000=0.0717, 9000=0.069, 15000=0.0677, 30000=0.0661, 60000=0.0635 (USD)", RoHS=Yes, Stock=9000, Supplier="Future Electronics"
D4: "6V 5V SOD-123 ESD and Surge Protection (TVS/ESD) ROHS", LCSC Part Number=C7079241, Manufacturer=AMAZING, Package=SOD-123, ComponentLink1Description=LCSC, ComponentLink1URL=https://www.lcsc.com/product-detail/ESD-and-Surge-Protection-TVS-ESD_AMAZING-AZ3005-01G_C7079241.html, Item Type=(TVS/ESD), Manufacturer Part Number=AZ3005-01G
D5: "TVS SURGE PROTECTOR 1-CH 3.3V", LCSC Part Number=-, Manufacturer=Amazing, Package=SOD-123, ComponentLink1Description=Digikey, ComponentLink1URL=https://www.digikey.com/en/products/detail/amazing/AZ3003-01G/16615352?s=N4IgTCBcDaIIIC0DMAGFSC0KCMBxEAugL5A, Item Type=Diode, Manufacturer Part Number=AZ3003-01G
D6: "TVS DIODE 24VWM 40VC SOT23-3", LCSC Part Number=C350941, Manufacturer=Bourns, ComponentLink1Description=http://www.farnell.com/datasheets/2372435.pdf?src-supplier=Farnell, ComponentLink1URL=http://www.farnell.com/datasheets/2372435.pdf?src-supplier=Farnell, ComponentLink2Description=https://www.bourns.com/docs/Product-Datasheets/cdsot23-t24can-Q.pdf?src-supplier=Digikey, ComponentLink2URL=https://www.bourns.com/docs/Product-Datasheets/cdsot23-t24can-Q.pdf?src-supplier=Digikey, ComponentLink3Description=http://www.farnell.com/datasheets/2372435.pdf?src-supplier=Newark, ComponentLink3URL=http://www.farnell.com/datasheets/2372435.pdf?src-supplier=Newark, Item Type="TVS Diodes", Manufacturer Part Number=CDSOT23-T24CAN-Q, Pricing="1=0.36, 10=0.282, 100=0.1691, 500=0.15656, 1000=0.10645, 3000=0.098, 6000=0.09393, 9000=0.08454, 30000=0.08328, 75000=0.07827 (USD)", RoHS=Yes, RoHS Compliant=5897YesNo, Stock=17231, Supplier=Digikey
D7: "SOT-23 TVS ROHS", LCSC Part Number=C521963, Manufacturer="TECH PUBLIC", Package=SOT-23, ComponentLink1Description=LCSC, ComponentLink1URL=https://www.lcsc.com/product-detail/TVS_TECH-PUBLIC-SM712_C521963.html, Item Type=Diode, Manufacturer Part Number=SM712
D8: "DIODE BIDIR ESD X4DFN2", LCSC Part Number=C896720, Manufacturer="ON Semiconductor", Item Type=(TVS/ESD), Manufacturer Part Number=ESDM2033MX4T5G, Pricing="8961=0.04129, 9000=0.04018, 18000=0.03906, 45000=0.03794, 90000=0.03683, 450000=0.03571, 900000=0.0346 (USD)", RoHS=Yes, Series=-, Stock=629400, Supplier=Avnet
D9: "TVS DIODE 3VWM SOT323-5", LCSC Part Number=C703691, Manufacturer=STMicroelectronics, ComponentLink1Description=https://datasheet.ciiva.com/23847/cd00002946-23847220.pdf?src-supplier=Newark, ComponentLink1URL=https://datasheet.ciiva.com/23847/cd00002946-23847220.pdf?src-supplier=Newark, ComponentLink2Description=https://datasheet.ciiva.com/4509/cd00002946-81943-4509940.pdf?src-supplier=Mouser, ComponentLink2URL=https://datasheet.ciiva.com/4509/cd00002946-81943-4509940.pdf?src-supplier=Mouser, ComponentLink3Description=https://datasheet.ciiva.com/5782/cd00002946-5782886.pdf?src-supplier=Farnell, ComponentLink3URL=https://datasheet.ciiva.com/5782/cd00002946-5782886.pdf?src-supplier=Farnell, ComponentLink4Description=https://datasheet.ciiva.com/338/cd00002946-338376.pdf?src-supplier=Digikey, ComponentLink4URL=https://datasheet.ciiva.com/338/cd00002946-338376.pdf?src-supplier=Digikey, ComponentLink5Description=https://datasheet.ciiva.com/338/cd00002946-338377.pdf?src-supplier=Digikey, ComponentLink5URL=https://datasheet.ciiva.com/338/cd00002946-338377.pdf?src-supplier=Digikey, ComponentLink6Description=https://datasheet.ciiva.com/338/cd00002946-338378.pdf?src-supplier=Digikey, ComponentLink6URL=https://datasheet.ciiva.com/338/cd00002946-338378.pdf?src-supplier=Digikey, Item Type="TVS Diodes", Manufacturer Part Number=ESDALC6V1W5, Pricing="3000=0.0569, 9000=0.0547, 12000=0.0774, 15000=0.0538, 30000=0.0749, 45000=0.0518, 75000=0.05 (USD)", RoHS=Yes, Stock=3000, Supplier="Future Electronics"
D10 D11 D12 D13: "SMC(DO-214AB) Diodes - Fast Recovery Rectifiers ROHS", LCSC Part Number=C7436549, Manufacturer=FUXINSEMI, Package=SMC(DO-214AB), ComponentLink1Description=LCSC, ComponentLink1URL=https://www.lcsc.com/product-detail/Diodes-Fast-Recovery-Rectifiers_FUXINSEMI-MURS360T3G_C7436549.html, Item Type=Diodes, Manufacturer Part Number=MURS360T3G
F1: "PTC RESET FUSE 6V 1.1A 0805", LCSC Part Number=C207024, Manufacturer=Littelfuse, ComponentLink1Description=https://datasheet.ciiva.com/326/littelfuse-resettable-ptcs-lorho-datasheet-326160.pdf?src-supplier=Digikey, ComponentLink1URL=https://datasheet.ciiva.com/326/littelfuse-resettable-ptcs-lorho-datasheet-326160.pdf?src-supplier=Digikey, ComponentLink2Description=https://datasheet.ciiva.com/28410/949281-28410775.pdf?src-supplier=Element14, ComponentLink2URL=https://datasheet.ciiva.com/28410/949281-28410775.pdf?src-supplier=Element14, Item Type=Fuses, Manufacturer Part Number=0805L110SLYR, Pricing="1=1.74, 5=1.448, 10=1.339, 50=1.1156, 100=1.0309, 250=0.92832, 500=0.85714, 1000=0.79108 (USD)", RoHS=Yes, Stock=3032, Supplier=Digikey
J1: "FUSE HOLDER BLADE 80V PCB", Current Rating=30A, LCSC Part Number=C207061, Manufacturer="Littelfuse Wickmann", Supplier Part Number=9883406, Body Material=4896ConductorMaterial, Category="Fuse Holders", ComponentLink1Description=https://datasheet.ciiva.com/295/littelfuse-ato-pcb-fuse-holders-178-6765-295568.pdf?src-supplier=Digikey, ComponentLink1URL=https://datasheet.ciiva.com/295/littelfuse-ato-pcb-fuse-holders-178-6765-295568.pdf?src-supplier=Digikey, ComponentLink2Description=https://datasheet.ciiva.com/4480/flrholder-58019-4480354.pdf?src-supplier=Mouser, ComponentLink2URL=https://datasheet.ciiva.com/4480/flrholder-58019-4480354.pdf?src-supplier=Mouser, ComponentLink3Description=https://datasheet.ciiva.com/16372/flrholder-16372408.pdf?src-supplier=Future+Electronics, ComponentLink3URL=https://datasheet.ciiva.com/16372/flrholder-16372408.pdf?src-supplier=Future+Electronics, ComponentLink4Description=https://datasheet.ciiva.com/15187/getdatasheetpartid-31610-15187861.pdf?src-supplier=Verical, ComponentLink4URL=https://datasheet.ciiva.com/15187/getdatasheetpartid-31610-15187861.pdf?src-supplier=Verical, Item Type="Fuse Holder", Lead Free=5697LeadFree, Manufacturer Part Number=178.6165.0002, Material=4896ConductorMaterial, Pricing="1=2.02, 40=1.96, 125=1.91, 400=1.86, 1250=1.77 (USD)", RoHS=Yes, Stock=3811, Supplier="Future Electronics", Thickness=6mm, Width=17.5mm
J2: "1x2P 18A -40℃~+105℃ 250V Orange 12~30 Straight 5.08mm 2.5 1 2 Plugin,P=5.08mm Screw terminal ROHS", LCSC Part Number=C430603, Manufacturer=DORABO, Package=Plugin,P=5.08mm, ComponentLink1Description=LCSC, ComponentLink1URL=https://www.lcsc.com/product-detail/Screw-terminal_DORABO-DB128L-5-08-2P-OG-S_C430603.html, Item Type="Terminal Block", Manufacturer Part Number=DB128L-5.08-2P-OG-S
J3: "RJ45Receptacle Unshielded 1 Bend-in Gold Phosphor Bronze Without LED Plugin Ethernet Connectors / Modular Connectors (RJ45 RJ11) ROHS", LCSC Part Number=C3000205, Manufacturer=HCTL, Package=Custom, ComponentLink1Description=LCSC, ComponentLink1URL=https://www.lcsc.com/product-detail/Ethernet-Connectors-Modular-Connectors-RJ45-RJ11_HCTL-HC-RJ45-5622-1-6-Y_C3000205.html, Item Type="Ethernet Connectors", Manufacturer Part Number=HC-RJ45-5622-1-6-Y
J4 J5: "Gold 250V 3A Straight Square Pins 2.5mm 2P 260℃ 6mm -40℃~+105℃ 3mm 2.54mm Plugin Black Brass 1x2P Plugin,P=2.54mm Pin Headers ROHS", LCSC Part Number=C706874, Manufacturer=XKB, Package=Plugin,P=2.54mm, ComponentLink1Description=LCSC, ComponentLink1URL=https://www.lcsc.com/product-detail/Pin-Headers_XKB-Connectivity-X6511WV-02H-C60D30_C706874.html, Item Type="Male Header", Manufacturer Part Number=X6511WV-02H-C60D30
J6: "CABLE ADAPTER 6 POS", Manufacturer=Tag-Connect, Package Quantity=1, Supplier Part Number 1=TC2030-IDC-ND, ComponentLink1Description=http://www.tag-connect.com/Materials/TC2030-MCP%20Datasheet.pdf?src-supplier=Digi-Key, ComponentLink1URL=http://www.tag-connect.com/Materials/TC2030-MCP%20Datasheet.pdf?src-supplier=Digi-Key, Manufacturer Part Number=TC2030-IDC, Pricing 1="1=43.71 (USD)", Stock 1=284, Supplier 1=Digi-Key
J7: "Gold 250V 3A Straight Square Pins 2.5mm 3P 260℃ 6mm -40℃~+105℃ 3mm 2.54mm Plugin Black Brass 1x3P Plugin,P=2.54mm Pin Headers ROHS", LCSC Part Number=C706875, Manufacturer=XKB, Package=Plugin,P=2.54mm, ComponentLink1Description=LCSC, ComponentLink1URL=https://www.lcsc.com/product-detail/Pin-Headers_XKB-Connectivity-X6511WV-03H-C60D30_C706875.html, Item Type="Male Header", Manufacturer Part Number=X6511WV-03H-C60D30
J8 J9 J10 J11: "1x2P 20A -40℃~+105℃ 300V Gray 12~30 Straight 5.08mm 1~2.5 1 2 Plugin,P=5.08mm Screw terminal ROHS", LCSC Part Number=C500021, Manufacturer=DORABO, Package=Plugin,P=5.08mm, ComponentLink1Description=LCSC, ComponentLink1URL=https://www.lcsc.com/product-detail/Screw-terminal_DORABO-DB128L-5-08-2P-GY-S_C500021.html, Item Type="Terminal Block", Manufacturer Part Number=DB128L-5.08-2P-GY-S
L1: library part YPRH0703-4R7M, "2.26A 4.7uH ±20% SMD,7.3x7.3mm Power Inductors ROHS", LCSC Part Number=C338836, Manufacturer=YJYCOIN, Package=SMD,7.3x7.3mm, ComponentLink1Description=LCSC, ComponentLink1URL=https://www.lcsc.com/product-detail/Power-Inductors_YJYCOIN-YPRH0703-4R7M_C338836.html, Item Type=Inductor, Manufacturer Part Number=YPRH0703-4R7M
L2: "FERRITE BEAD 600 OHM 0402 1LN", Case Code (Imperial)=0402, Case Code (Metric)=1005, Current Rating=300mA, DC Resistance (DCR)=520mR, DC Resistance-Max=600mR, Frequency=100MHz, LCSC Part Number=C76884, Manufacturer=Murata, Max Operating Temperature=125°C, Min Operating Temperature=-55°C, Package Quantity=10000, Supplier Part Number 1=490-1006-1-ND, Tolerance=25%, Case/Package=0402, Category=Inductors, ComponentLink1Description=https://datasheet.ciiva.com/11799/0900766b811b5866-11799226.pdf?src-supplier=RSComponents, ComponentLink1URL=https://datasheet.ciiva.com/11799/0900766b811b5866-11799226.pdf?src-supplier=RSComponents, ComponentLink2Description=https://datasheet.ciiva.com/41449/001172163-da-01-en-drossel-0402-600r-1-0x0-5mm-10000st-41449450.pdf?src-supplier=Conrad, ComponentLink2URL=https://datasheet.ciiva.com/41449/001172163-da-01-en-drossel-0402-600r-1-0x0-5mm-10000st-41449450.pdf?src-supplier=Conrad, ComponentLink3Description=https://datasheet.ciiva.com/29347/442210-da-01-en-chip-drossel-0402-600r-300ma-1-0x0-5mm-29347879.pdf?src-supplier=Conrad, ComponentLink3URL=https://datasheet.ciiva.com/29347/442210-da-01-en-chip-drossel-0402-600r-300ma-1-0x0-5mm-29347879.pdf?src-supplier=Conrad, ComponentLink4Description=https://datasheet.ciiva.com/1466/5144-1466744.pdf?src-supplier=Element14, ComponentLink4URL=https://datasheet.ciiva.com/1466/5144-1466744.pdf?src-supplier=Element14, ComponentLink5Description=https://datasheet.ciiva.com/1466/5144-1466745.pdf?src-supplier=Element14, ComponentLink5URL=https://datasheet.ciiva.com/1466/5144-1466745.pdf?src-supplier=Element14, ComponentLink6Description=https://datasheet.ciiva.com/14122/blm-series-eng-tds-14122894.pdf?src-supplier=Distrelec, ComponentLink6URL=https://datasheet.ciiva.com/14122/blm-series-eng-tds-14122894.pdf?src-supplier=Distrelec, ComponentLink7Description=https://datasheet.ciiva.com/6212/l0110s0100blm15ag-sn-6212519.pdf?src-supplier=Digi-Key, ComponentLink7URL=https://datasheet.ciiva.com/6212/l0110s0100blm15ag-sn-6212519.pdf?src-supplier=Digi-Key, ComponentLink8Description=https://datasheet.ciiva.com/6212/l0110s0100blm15ag-sn-6212565.pdf?src-supplier=Digi-Key, ComponentLink8URL=https://datasheet.ciiva.com/6212/l0110s0100blm15ag-sn-6212565.pdf?src-supplier=Digi-Key, ComponentLink9Description=https://datasheet.ciiva.com/6212/l0110s0100blm15ag-sn-6212520.pdf?src-supplier=Digi-Key, ComponentLink9URL=https://datasheet.ciiva.com/6212/l0110s0100blm15ag-sn-6212520.pdf?src-supplier=Digi-Key, ComponentLink10Description=https://datasheet.ciiva.com/8084/l0110s0100blm15ag-sn-8084271.pdf?src-supplier=Avnet, ComponentLink10URL=https://datasheet.ciiva.com/8084/l0110s0100blm15ag-sn-8084271.pdf?src-supplier=Avnet, ComponentLink11Description=https://datasheet.ciiva.com/8510/l0110s0100blm15ag-sn-8510909.pdf?src-supplier=Avnet, ComponentLink11URL=https://datasheet.ciiva.com/8510/l0110s0100blm15ag-sn-8510909.pdf?src-supplier=Avnet, Core Material=Ferrite, DC Current=300mA, Depth=0.55mm, Height=0.5mm, Impedance=600R, Item Type="Ferrite Bead", Lead Free="Lead Free", Length=1mm, Manufacturer Part Number=BLM15AG601SN1D, Material=Steel,Ferrite, Max Current Rating=300mA, Max DC Current=300mA, Military Standard=Not, Number of Circuits=1, Number of Lines=1, Number of Pins=2, Packaging="Tape and Reel", Pricing 1="1=0.10000, 10=0.06500, 25=0.05760, 50=0.05240, 100=0.04710, 250=0.03456, 500=0.02514, 1000=0.02461, 5000=0.01676 (USD)", Radiation Hardening=No, REACH SVHC="No SVHC", RoHS=Yes, RoHS Compliant=Yes, Series=BLM15AG_SN, Shielding=Unshielded, Stock 1=4108655, Supplier 1=Digi-Key, Termination=SMD/SMT, Test Frequency=100MHz, Width=0.5mm
LED1 LED2 LED3 LED9 LED10 LED11 LED12: library part NCD0603R3, "RED LED 0603 Light Emitting Diodes", LCSC Part Number=C3151730, Manufacturer="Foshan NationStar Optoelectronics", Package=0603, ComponentLink1Description=LCSC, ComponentLink1URL=https://www.lcsc.com/product-detail/Light-Emitting-Diodes-LED_Foshan-NationStar-Optoelectronics-NCD0603R3_C3151730.html, Item Type=LED, Manufacturer Part Number=NCD0603R3